# Altium PCB VA_NodeV1.2.PcbDoc (part 3 of 4)
Units mil, origin at the board's own origin, x right, y up, seen from the top; angles counter-clockwise.
Board outline 2925 x 2390 mil, 2 copper layers (Top Layer, Bottom Layer), stack 57 mil thick; 152 components, 110 nets, 488 pads, 205 vias.
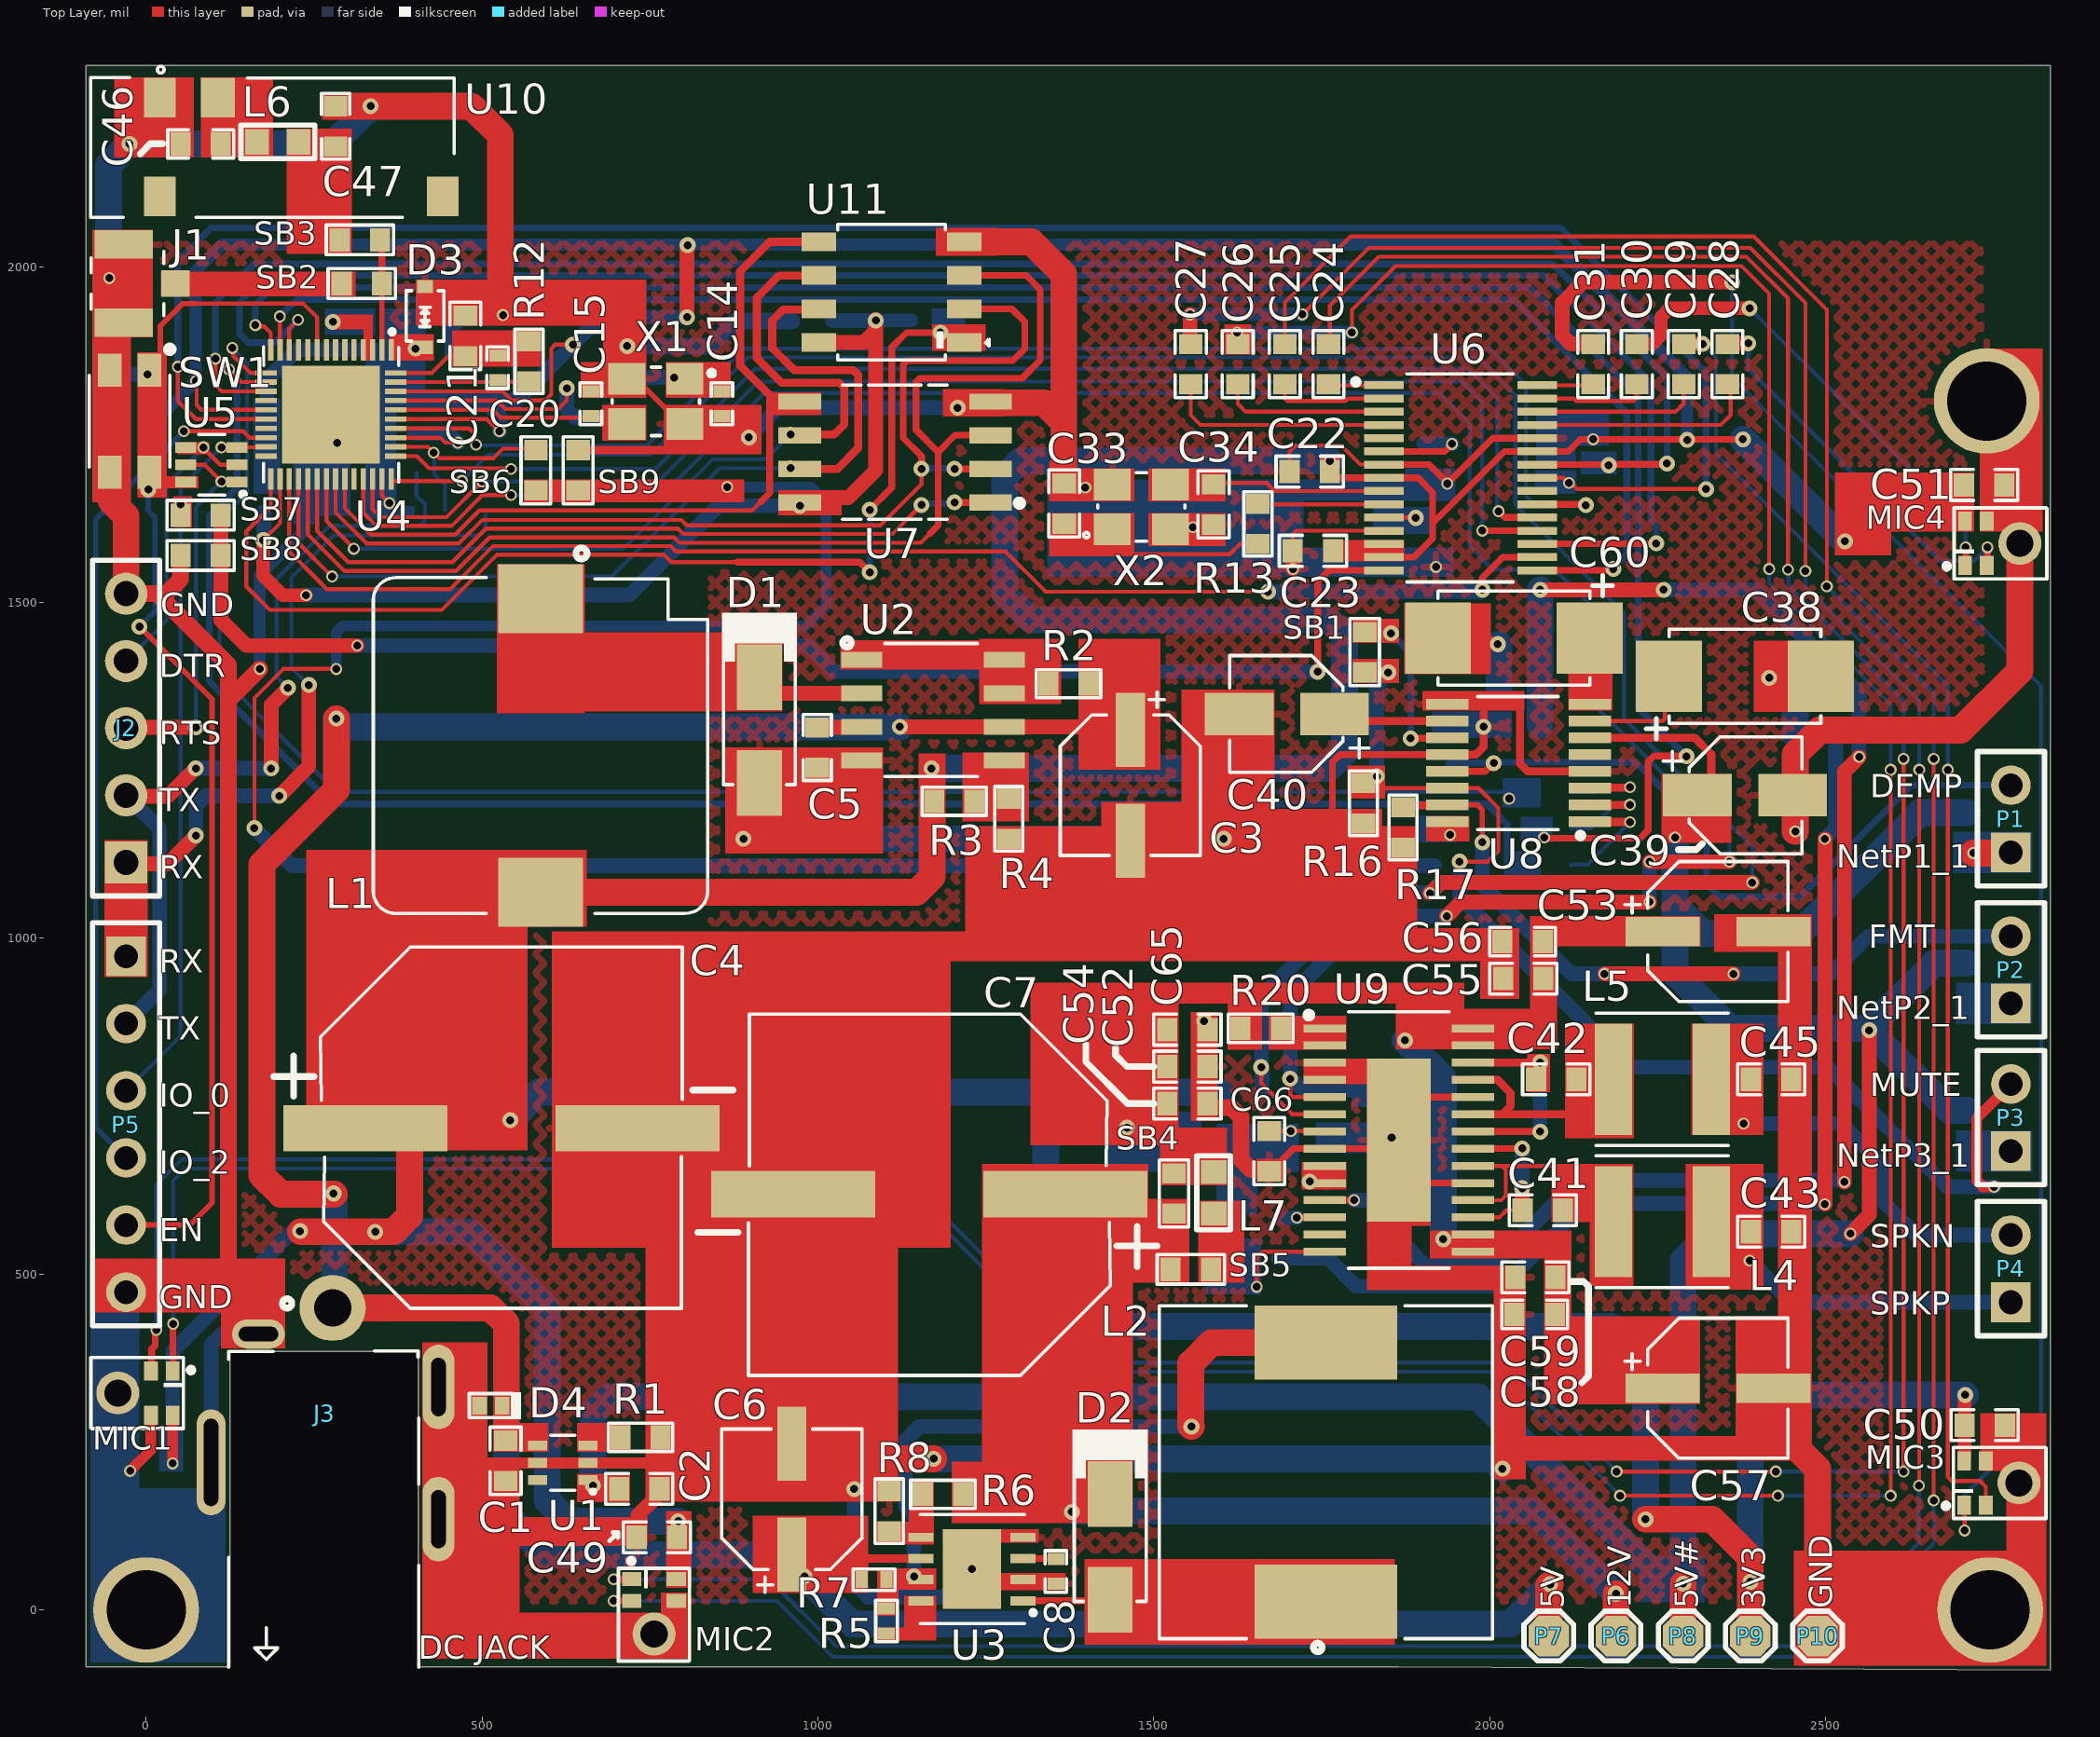
[diagram p0: Top Layer view]

## Part data (continued)
U6: "IC ADC/AUDIO 24BIT 192K 30TSSOP", Case/Package=TSSOP, Manufacturer="Texas Instruments", Max Operating Temperature=125°C, Max Supply Voltage=3.6V, Min Operating Temperature=-40°C, Min Supply Voltage=3V, Operating Supply Current=31mA, Operating Supply Voltage=3.3V, Package Quantity=2000, Power Consumption=145mW, Supplier Part Number 1=595-PCM1865DBTR, Category="Amplifiers - Audio", ComponentLink1Description=https://datasheet.ciiva.com/48474/pcm1861-48474798.pdf?src-supplier=Avnet, ComponentLink1URL=https://datasheet.ciiva.com/48474/pcm1861-48474798.pdf?src-supplier=Avnet, ComponentLink2Description=https://datasheet.ciiva.com/29699/pcm1861-29699238.pdf?src-supplier=Digi-Key, ComponentLink2URL=https://datasheet.ciiva.com/29699/pcm1861-29699238.pdf?src-supplier=Digi-Key, Contact Plating=Gold, Interface=I2C,SPI,Serial, Lead Free="Lead Free", Manufacturer Part Number=PCM1865DBTR, Mount="Surface Mount", Number of A/D Converters=4, Number of ADC Channels=4, Number of Analog Inputs=8, Number of DAC Channels=0, Number of Pins=30, Packaging="Tape and Reel", Pricing 1="1=10.72000, 10=9.69000, 25=9.23000, 50=9.23000, 100=8.02000, 250=7.66000, 500=6.98000, 1000=6.54000, 10000=6.54000 (USD)", Resolution=24b, RoHS=Yes, RoHS Compliant=Yes, Sampling Rate=192KS/s, Supplier 1=Mouser, Supply Type=Single, Weight=0.003439oz
U7: "IC FLASH 64MBIT SPI/QUAD 8SOIC", Manufacturer=Winbond, Supplier Part Number 1=W25Q64FVSSIQ-ND, Category=Memory, Manufacturer Part Number=W25Q64FVSSIQ, RoHS=No, Supplier 1=Digi-Key
U8: "IC DAC/AUDIO 24BIT 200K 16SSOP", Case/Package=SSOP, Manufacturer="Texas Instruments", Max Operating Temperature=85°C, Max Power Dissipation=105mW, Max Supply Voltage=5.5V, Min Operating Temperature=-40°C, Min Supply Voltage=4.5V, Nominal Supply Current=30mA, Operating Supply Voltage=5V, Package Quantity=2000, Power Consumption=80mW, Supplier Part Number 1=595-PCM1754DBQR, Category="Amplifiers - Audio", ComponentLink1Description=https://datasheet.ciiva.com/41460/001186173-da-01-en-ic-dac-24bit-mon-pcm1754dbqr-ssop-16-tid-41460109.pdf?src-supplier=Conrad, ComponentLink1URL=https://datasheet.ciiva.com/41460/001186173-da-01-en-ic-dac-24bit-mon-pcm1754dbqr-ssop-16-tid-41460109.pdf?src-supplier=Conrad, ComponentLink2Description=https://datasheet.ciiva.com/1388/pcm1753-1388404.pdf?src-supplier=Digi-Key, ComponentLink2URL=https://datasheet.ciiva.com/1388/pcm1753-1388404.pdf?src-supplier=Digi-Key, ComponentLink3Description=https://datasheet.ciiva.com/1388/pcm1753-1388403.pdf?src-supplier=Digi-Key, ComponentLink3URL=https://datasheet.ciiva.com/1388/pcm1753-1388403.pdf?src-supplier=Digi-Key, ComponentLink4Description=https://datasheet.ciiva.com/1388/pcm1753-1388405.pdf?src-supplier=Digi-Key, ComponentLink4URL=https://datasheet.ciiva.com/1388/pcm1753-1388405.pdf?src-supplier=Digi-Key, ComponentLink5Description=https://datasheet.ciiva.com/15146/getdatasheetpartid-213919-15146955.pdf?src-supplier=Verical, ComponentLink5URL=https://datasheet.ciiva.com/15146/getdatasheetpartid-213919-15146955.pdf?src-supplier=Verical, Contact Plating=Gold, Conversion Rate=192KS/s, Height=1.5mm, Integral Nonlinearity (INL)=0.5LSB, Interface=Serial,3-WIRE, Lead Free="Lead Free", Length=5mm, Manufacturer Part Number=PCM1754DBQR, Mount="Surface Mount", Number of Analog Inputs=0, Number of Analog Outputs=2, Number of Bits=24, Number of Channels=2, Number of Converters=2, Number of DAC Channels=2, Number of Pins=16, Output Polarity=Bipolar, Output Type=Voltage, Packaging="Tape and Reel", Polarity=Bipolar, Pricing 1="1=2.14000, 10=1.93000, 25=1.82000, 50=1.82000, 100=1.55000, 250=1.46000, 500=1.28000, 1000=1.06000, 10000=1.06000 (USD)", Radiation Hardening=No, Resolution=24b, RoHS=Yes, RoHS Compliant=Yes, Sampling Rate=192000S/s, Series=PCM1754, Signal to Noise Ratio (SNR)=106dB, Stock 1=908, Supplier 1=Mouser, Supply Type=Single, Weight=0.002603oz, Width=4mm
U9: "Amplifier IC 1-Channel (Mono) Class D 28-HTSSOP", Case/Package=HTSSOP, Manufacturer="Texas Instruments", Max Operating Temperature=85°C, Max Output Power=10W, Max Supply Voltage=26V, Min Operating Temperature=-40°C, Min Supply Voltage=8V, Nominal Supply Current=40mA, Package Quantity=2000, Power Dissipation=4.98W, Supplier Part Number 1=595-TPA3111D1PWPR, Voltage Gain=36dB, Category="Amplifiers - Audio", ComponentLink1Description=https://datasheet.ciiva.com/15131/getdatasheetpartid-376403-15131942.pdf?src-supplier=Verical, ComponentLink1URL=https://datasheet.ciiva.com/15131/getdatasheetpartid-376403-15131942.pdf?src-supplier=Verical, ComponentLink2Description=https://datasheet.ciiva.com/2969/tpa3111d1-2969959.pdf?src-supplier=Avnet, ComponentLink2URL=https://datasheet.ciiva.com/2969/tpa3111d1-2969959.pdf?src-supplier=Avnet, ComponentLink3Description=https://datasheet.ciiva.com/1789/tpa3111d1-1789051.pdf?src-supplier=Digi-Key, ComponentLink3URL=https://datasheet.ciiva.com/1789/tpa3111d1-1789051.pdf?src-supplier=Digi-Key, Gain=37dB, Lead Free="Lead Free", Load Impedance=8R, Manufacturer Part Number=TPA3111D1PWPR, Number of Channels=1, Number of Pins=28, Output Power=10W, Packaging="Tape and Reel", Pricing 1="1=2.26000, 10=2.04000, 25=1.92000, 50=1.92000, 100=1.64000, 250=1.54000, 500=1.35000, 1000=1.12000, 2000=1.11000, 10000=1.11000 (USD)", Radiation Hardening=No, REACH SVHC="No SVHC", RoHS=Yes, RoHS Compliant=Yes, Series=SpeakerGuard™, Supplier 1=Mouser, Supply Current=40mA
U10: "RF ANT 2.4GHZ STAMPED MET SLD", Manufacturer=Proant, Supplier Part Number 1=1532-1001-6-ND, ComponentLink1Description=https://media.digikey.com/pdf/Data%20Sheets/Proant%20PDF's/PRO-OB-440_Dwg.PDF?src-supplier=Digi-Key, ComponentLink1URL=https://media.digikey.com/pdf/Data%20Sheets/Proant%20PDF's/PRO-OB-440_Dwg.PDF?src-supplier=Digi-Key, ComponentLink2Description=http://www.proant.se/files/user/Application%20note%20-%20OnBoard%20SMD%20GNSS%20rev%202.0.pdf?src-supplier=Digi-Key, ComponentLink2URL=http://www.proant.se/files/user/Application%20note%20-%20OnBoard%20SMD%20GNSS%20rev%202.0.pdf?src-supplier=Digi-Key, ComponentLink3Description=http://www.proant.se/files/user/Documents/Datasheet%20-%20OnBoard%20SMD%202400%20MHz%20rev%203.pdf?src-supplier=Digi-Key, ComponentLink3URL=http://www.proant.se/files/user/Documents/Datasheet%20-%20OnBoard%20SMD%202400%20MHz%20rev%203.pdf?src-supplier=Digi-Key, Manufacturer Part Number=PRO-OB-440, Mount="Surface Mount", Number of Bands=1, Packaging="Cut Tape", Pricing 1="1=0.74, 10=0.647, 25=0.608, 100=0.4964, 250=0.46104, 500=0.39238 (USD)", Return Loss=-10dB, Stock 1=23502, Supplier 1=Digi-Key, Termination=Solder
U11: "SOP-8_150mil SRAM ROHS", LCSC Part Number=C261881, Manufacturer="Lyontek Inc", ComponentLink1Description=LCSC, ComponentLink1URL=https://lcsc.com/product-detail/RAM_Lyontek-Inc-LY68L6400SLIT_C261881.html, Manufacturer Part Number=LY68L6400SLIT
X1: library part X322540MPB4SI, "40MHz SMD Crystal Resonator 15pF ±10ppm ±30ppm -40℃~+85℃ SMD3225-4P Crystals ROHS", Manufacturer="Yangxing Tech", Manufacturer Part Number=X322540MPB4SI
X2: library part S3224576121060, "24.576MHz SMD Crystal Resonator 12pF 60Ω ±10ppm -40℃~+85℃ SMD3225-4P Crystals ROHS", Manufacturer=JGHC, ComponentLink1Description=LCSC, ComponentLink1URL=https://lcsc.com/product-detail/Crystals_JGHC-S3224576121060_C390772.html, Manufacturer Part Number=S3224576121060

## Free pads (board coordinates)
  round 157.48 hole 118.11: MH1(0,0) MH2(2745,0) MH3(2740,1800)

## Via types
v1: diameter 23.62, hole 11.81, Top Layer to Bottom Layer, tented both sides, 93 vias
v2: diameter 17.72, hole 11.81, Top Layer to Bottom Layer, tented both sides, 81 vias
v3: diameter 17.72, hole 11.81, Top Layer to Bottom Layer, 20 vias
v4: diameter 23.62, hole 11.81, Top Layer to Bottom Layer, 11 vias

## Nets (pads, with @x,y where several pads share a name; then routed paths per layer and width w, separated by ;. In a path a pad name is that pad's centre, name@x,y a point inside that pad or via, vN(x,y) a via of type N, cw(c..) or ccw(c..) an arc to the next point about the centre after c; other vN are vias at no path point)
\F\A\U\L\T\: R20.2 U9.1 U9.2
AVCC: C66.1 R29.1 R30.2 U9.7 | length 82.8
  Top Layer w6: C66.1@1672,713 v2(1704,713) 1753.89,713 U9.7@1754.53,712.36
BCK_DAC: R23.2 U4.16 | length 2639.3
  Top Layer w6: v2(123,1847) 141.77,1828.23 U4.16@178.74,1828.23
  Bottom Layer w10: v2(123,1847) 135,1835 135,1671 94,1630 94,1382 276,1200 1996,1200 2026,1170 2026,1101
BCKA: U4.27 U6.17 | length 2075.7
  Top Layer w6: U4.27@212.99,1683.74 212.99,1575.67 257.83,1530.84 268.66,1520 452.47,1520 516.47,1584 780.58,1584 788.58,1576 1279,1576 1339,1516 v1(1670,1516)
  Top Layer w10: v1(1989,1519) 1989,1537 2019.52,1567.52 U6.17@2071,1567.52
  Bottom Layer w22: v1(1670,1516) 1985.56,1516 1988.56,1519 v1(1989,1519)
BSN: C42.2 U9.22 U9.26 | length 300.8
  Top Layer w6: U9.26@1974.86,814.86 U9.26@1975,814.72 ; C42.2@2072,790 C42.2@2073,791 ; v1@2074.64,712.36 v1(2075,712)
  Top Layer w10: U9.22@1975,712.36 v1@2074.64,712.36
  Top Layer w12: U9.26@2000.5,814.82 2071.82,814.82 2072,815 2072,792 C42.2@2073,791
  Bottom Layer w22: v1(2075,712) v1(2075,815)
BSP: C41.2 U9.17 U9.21 | length 244
  Top Layer w6: U9.17@1975,584.41 2014.41,584.41 2025,595 C41.2@2049,595
  Top Layer w10: U9.21@1975,686.77 v1@2048.31,686.77
  Top Layer w22: v1(2048.31,627.69) 2048.31,595.69 C41.2@2049,595
  Bottom Layer w22: v1(2048.31,627.69) v1(2048.31,687)
CAP1: C20.2 C21.1 R12.1 U4.48 | length 164.1
  Top Layer w6: U4.48@371.26,1842.01 425.01,1842.01 449.01,1866.01 474.99,1866.01 C21.1@475.98,1867 ; C21.1@476.98,1869 C20.2@526,1869
CAP2: C20.1 R12.2 U4.47 | length 244.5
  Top Layer w6: U4.47@371.26,1828.23 525,1828.23 R12.2@570.77,1828.23 ; C20.1@525,1829 R12.2@570,1829
CII: R3.2 R4.2 U2.5
CII#: R6.2 R8.2 U3.5
DATA_DAC: R24.2 U4.14 | length 3128.5
  Top Layer w6: v2@164.28,1911.14 175.86,1911.14 185.43,1901.57 U4.14@185.43,1876.26
  Top Layer w10: v2(2081,1150) 2082,1149 2224,1149 2236,1161 2236,1263 2244.54,1271.54 2292.46,1271.54 v1(2293,1271)
  Bottom Layer w6: R24.2@2061,1163.5 2061.5,1163 2077,1163 2081,1159
  Bottom Layer w10: v2(162.43,1913) 162.43,1943.43 188,1969 2060,1969 2221,1808 2221,1343 v1(2293,1271)
DEMP: P1.2 R15.1 U8.13 | length 1108.9
  Top Layer w10: U8.13@1936.79,1248.5 1993.5,1248.5 v1(2006,1261)
  Bottom Layer w10: R15.1@1938,1261 v1(2006,1261) 2007,1262 2218,1262 2323,1157 2323,1081 2342,1062 2462,1062 2628,1228 P1.2@2776,1228
DOUT1: U4.12 U6.18 | length 2807.1
  Top Layer w6: U4.12@212.99,1876.26 212.99,1907.99 v2(226,1921)
  Top Layer w10: U6.18@2071,1587.2 2071.4,1587.6 2247.6,1587.6 v1(2248,1588)
  Bottom Layer w10: v2(226,1921) 192,1887 152,1887 139,1900 139,1947 179,1987 2080,1987 2240,1827 2240,1623.69 2248,1615.69 v1(2248,1588)
DTR: J2.4 U5.2 U5.4 | length 451.5
  Top Layer w6: U5.4@61.81,1730.59 62.11,1730.3 U5.4@70,1730.3 ; U5.4@70,1730 85,1730 110,1705 U5.2@138.19,1705
  Bottom Layer w6: J2.4@-30,1413 30,1473 30,1675 v2@85,1730
  other v2: 85,1731